# Altium PCB PCB1.pcbdoc (part 1 of 2)
Units mil, origin at the board's own origin, x right, y up, seen from the top; angles counter-clockwise.
Board outline 2165.35 x 3346.46 mil, 4 copper layers (Top Layer, Inner1, Inner2, Bottom Layer), stack 62.447 mil thick; 78 components, 74 nets, 396 pads, 501 vias.
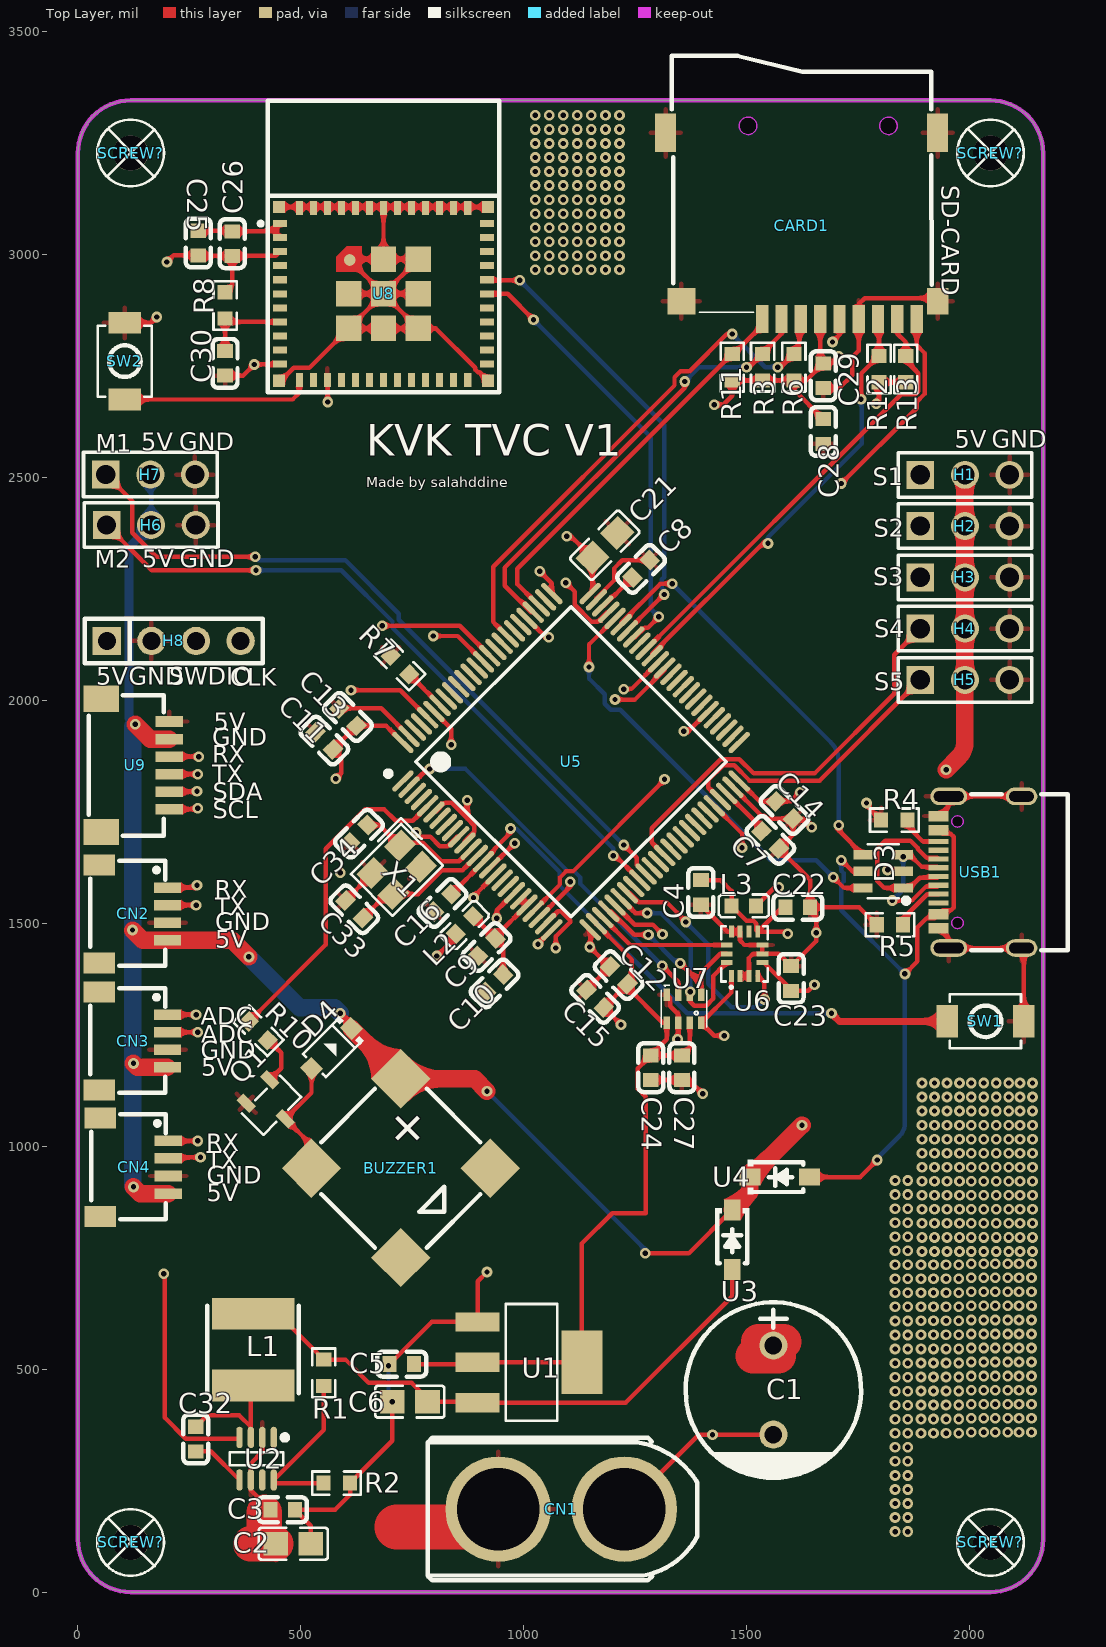
[diagram p0: Top Layer view]
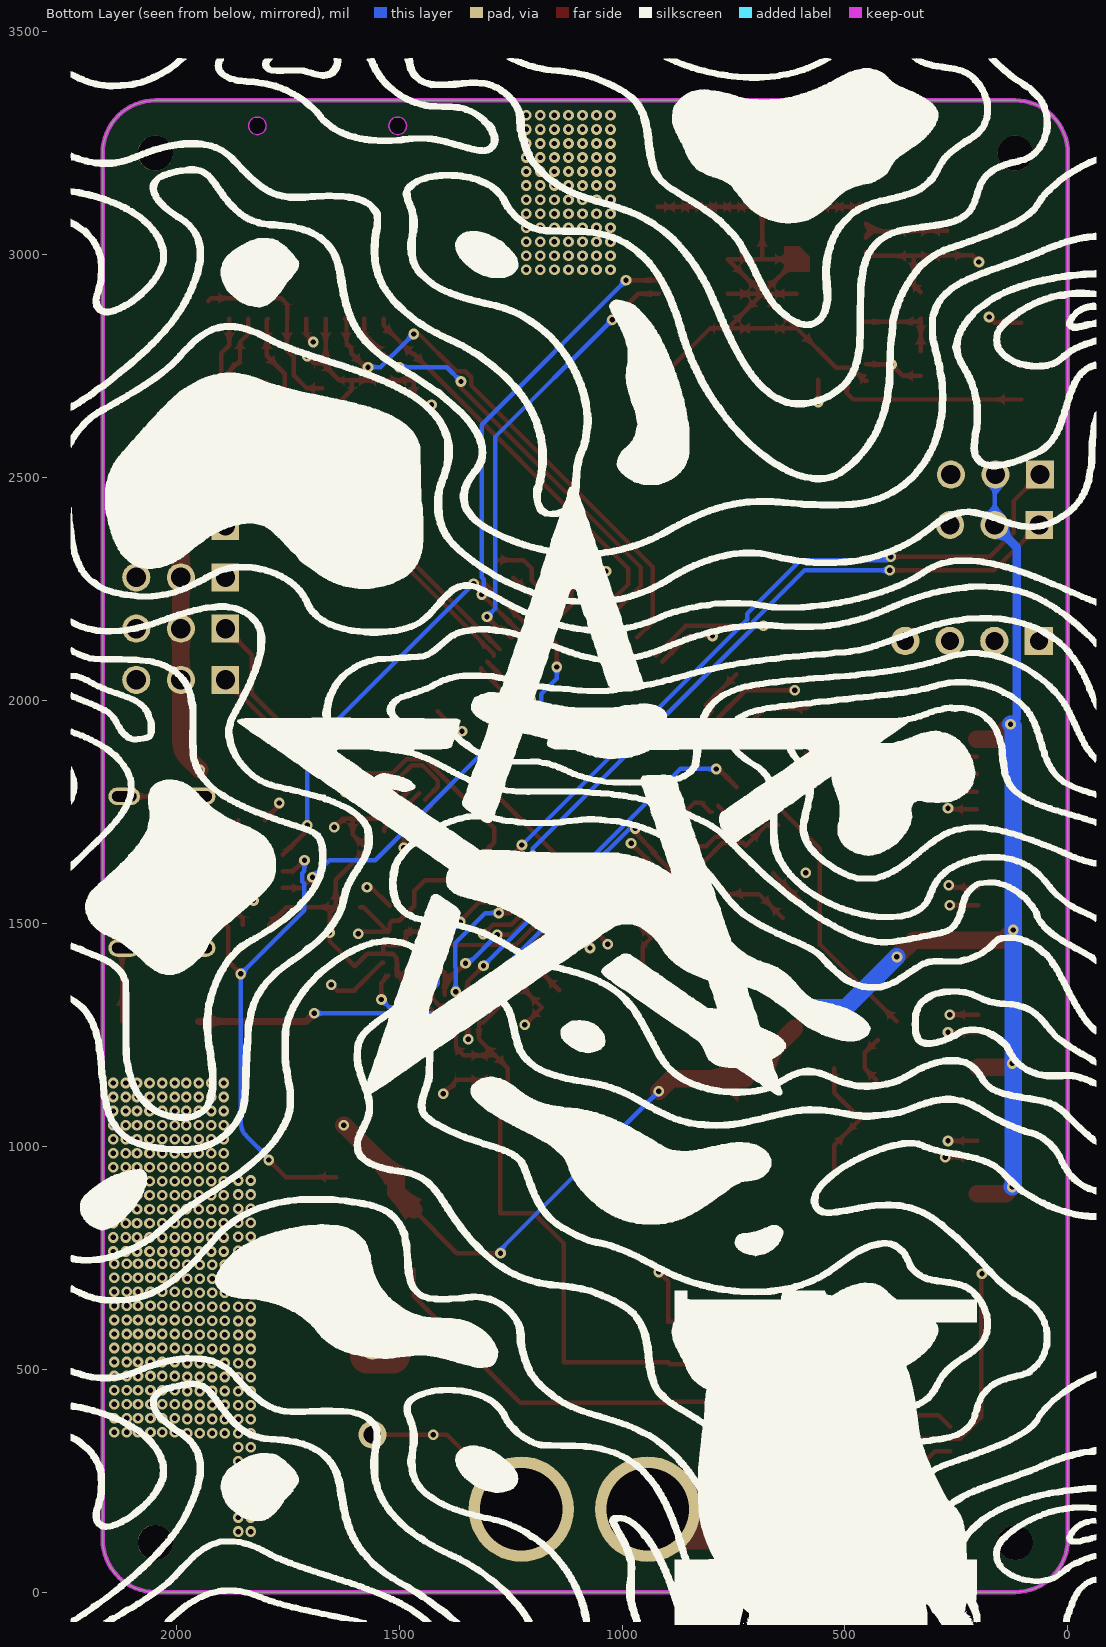
[diagram p1: Bottom Layer view, seen from below]
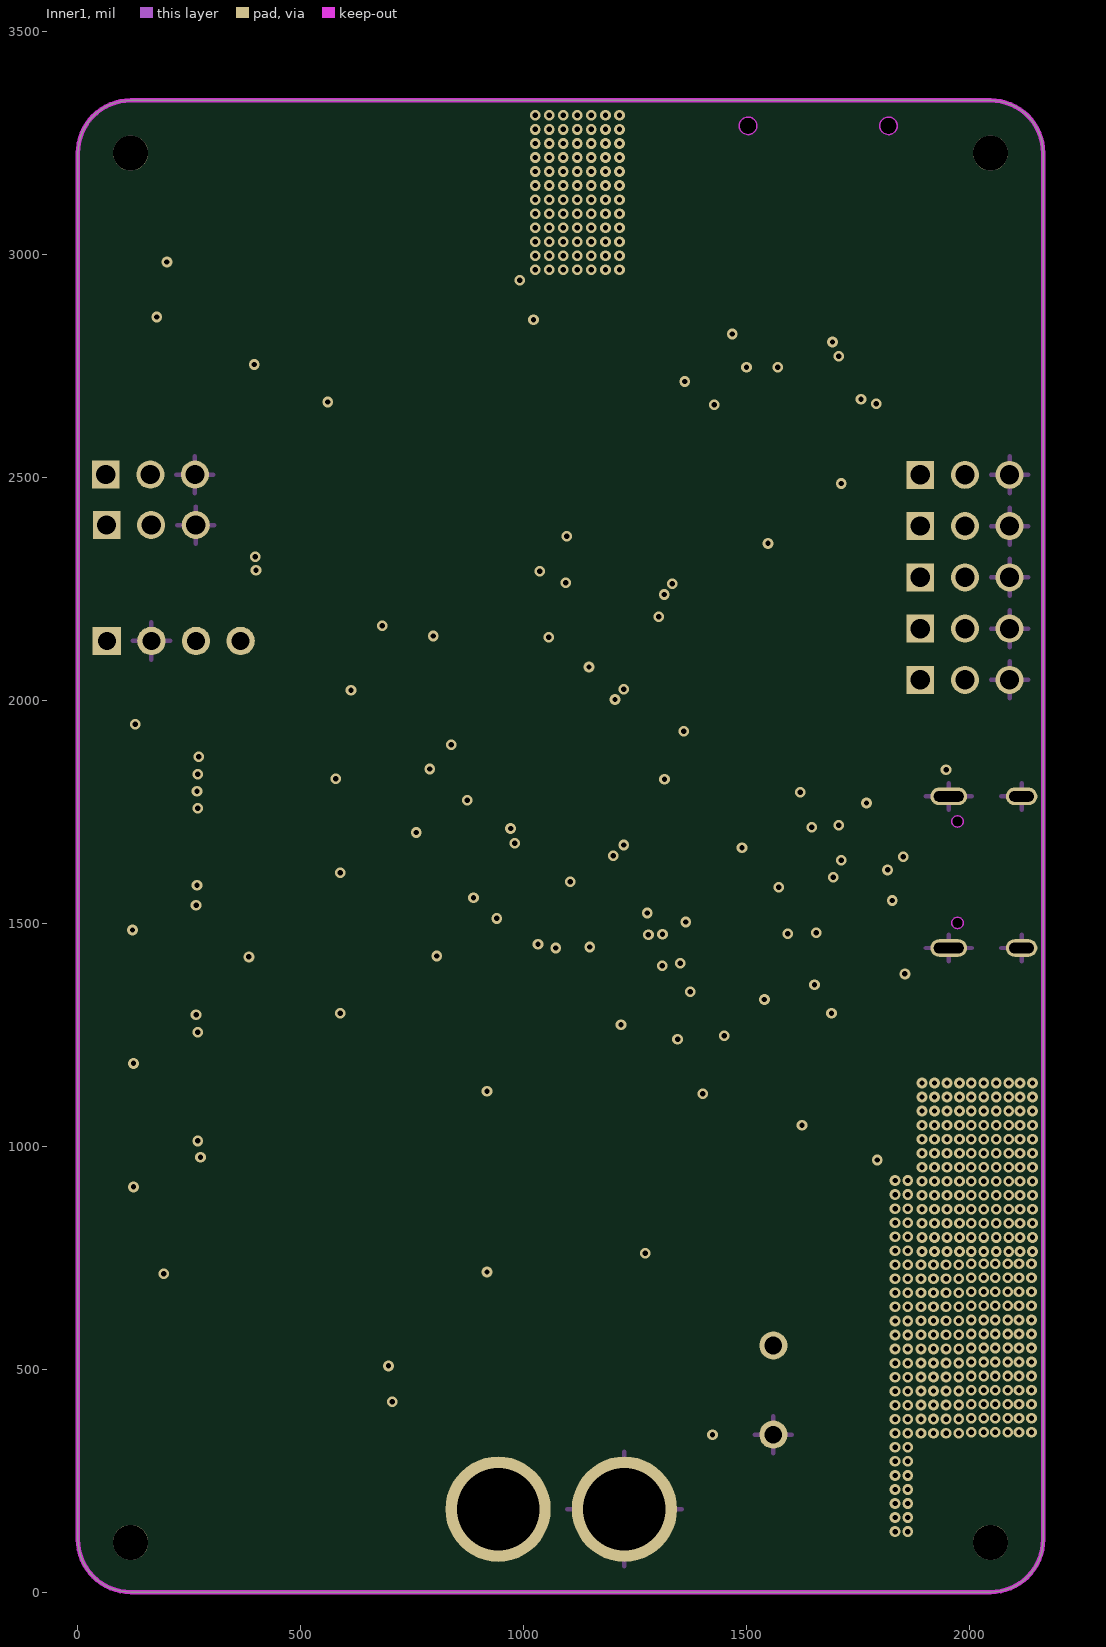
[diagram p2: Inner1]
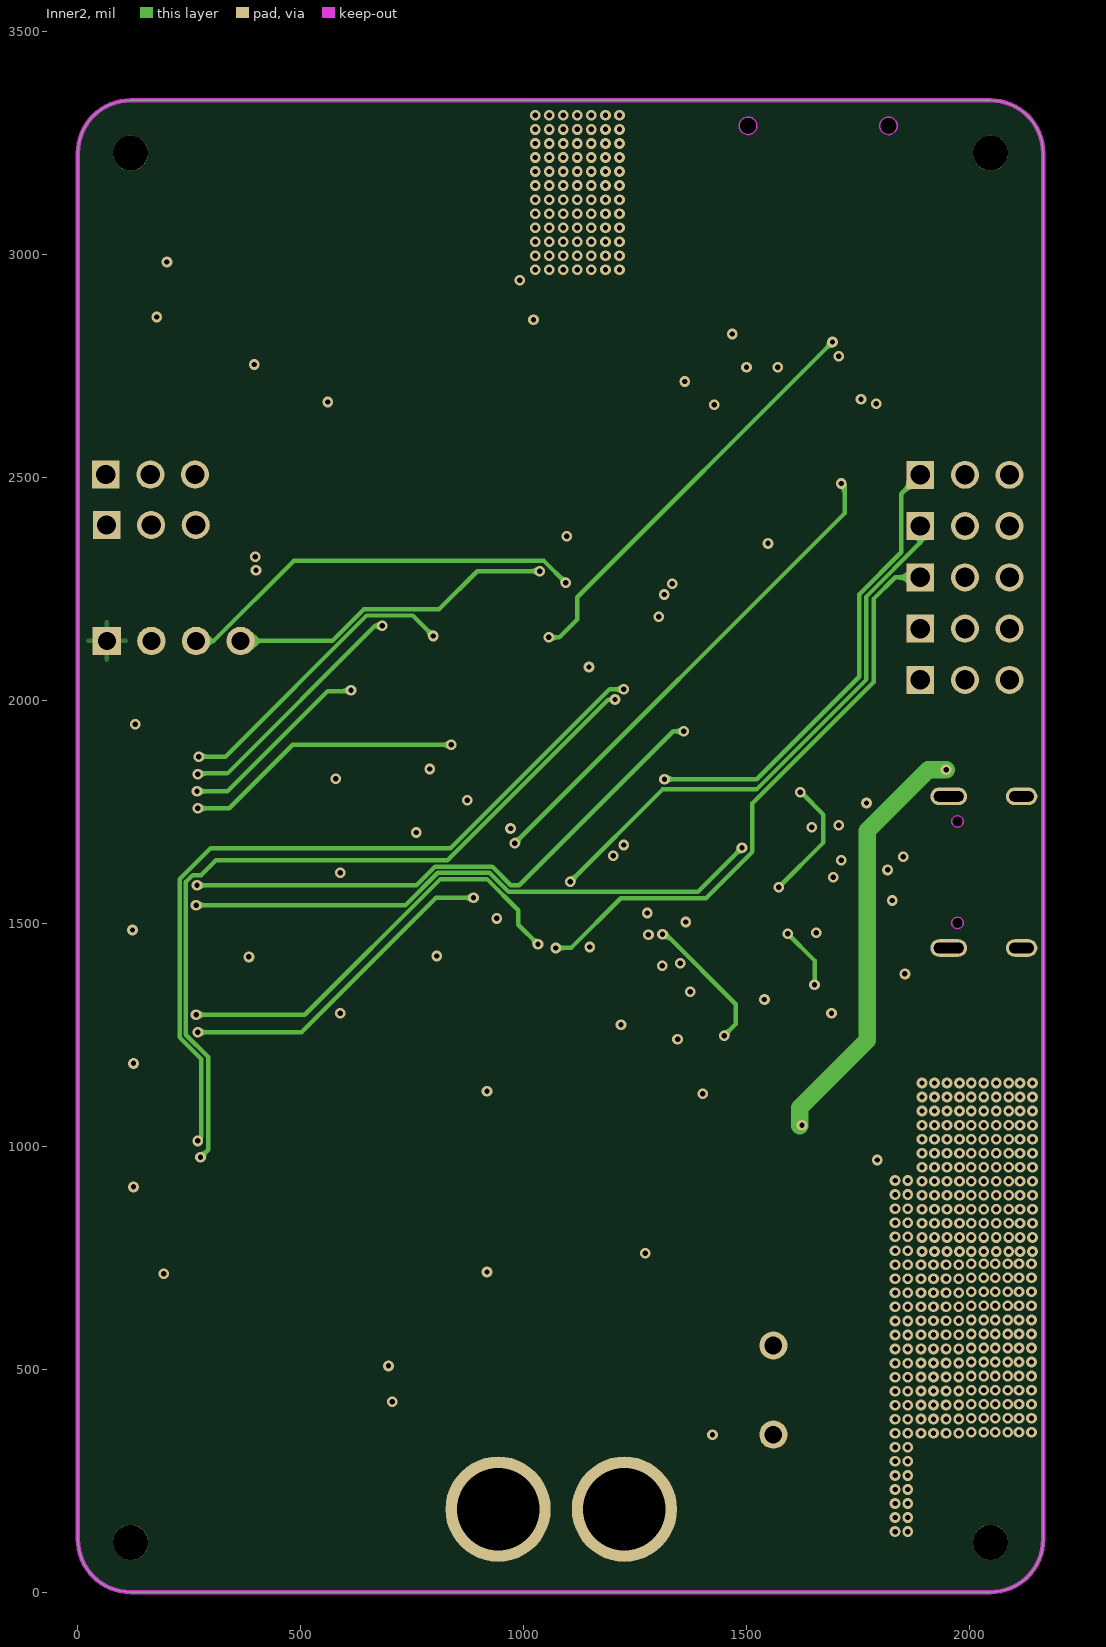
[diagram p3: Inner2]

## Layer stack, top to bottom
Top Layer: signal copper 1.378
Dielectric1: surface 8.283, 7628 RC49% 8.6mil, Dk 0
Inner1: signal copper 0.598
Dielectric2: surface 41.929, 1.1mm H/HOZ Copper, Dk 0
Inner2: signal copper 0.598
Dielectric3: surface 8.283, 7628 RC49% 8.6mil, Dk 0
Bottom Layer: signal copper 1.378

## Board outline
118.11,3346.46 ccw(c118.11,3228.35) 0,3228.35 0,118.11 ccw(c118.11,118.11) 118.11,0 2047.24,0 ccw(c2047.24,118.11) 2165.35,118.11 2165.35,3228.35 ccw(c2047.24,3228.35) 2047.24,3346.46 118.11,3346.46

## Design rules (kind name [scope] priority, off if disabled: settings)
BoardOutlineClearance copperThickness2oz_1 [All] p2 off: genericclearance=7.99 ignorepadtopadclearanceinfootprint=FALSE except(0: Arc-SplitContinuation Track-SplitContinuation SMDPad-SplitContinuation THPad-SplitContinuation Via-SplitContinuation Fill-SplitContinuation Region-SplitContinuation Poly-SplitContinuation Text-SplitContinuation Hole-SplitContinuation; 5.98: Arc-CutoutEdge SMDPad-CutoutEdge THPad-CutoutEdge Via-CutoutEdge Fill-CutoutEdge Region-CutoutEdge Text-CutoutEdge; 6.93: Hole-OutlineEdge Hole-CutoutEdge; 10: Poly-OutlineEdge Poly-CutoutEdge; 11.81: Arc-OutlineEdge Track-OutlineEdge SMDPad-OutlineEdge THPad-OutlineEdge Via-OutlineEdge Fill-OutlineEdge Region-OutlineEdge Text-OutlineEdge Track-CutoutEdge)
BoardOutlineClearance copperThickness1oz_1 [All] p4: genericclearance=4.02 ignorepadtopadclearanceinfootprint=FALSE except(0: Arc-SplitContinuation Track-SplitContinuation SMDPad-SplitContinuation THPad-SplitContinuation Via-SplitContinuation Fill-SplitContinuation Region-SplitContinuation Poly-SplitContinuation Text-SplitContinuation Hole-SplitContinuation; 6: SMDPad-CutoutEdge THPad-CutoutEdge Via-CutoutEdge Fill-CutoutEdge Region-CutoutEdge Text-CutoutEdge; 6.93: Hole-OutlineEdge Hole-CutoutEdge; 10: Poly-OutlineEdge Poly-CutoutEdge; 11.8: Arc-OutlineEdge Track-OutlineEdge SMDPad-OutlineEdge THPad-OutlineEdge Via-OutlineEdge Fill-OutlineEdge Region-OutlineEdge Text-OutlineEdge; 11.81: Arc-CutoutEdge Track-CutoutEdge)
Clearance copperThickness2oz [All] p1 off: gap=7.99 ignorepadtopadclearanceinfootprint=FALSE except(5.98: SMDPad-Track SMDPad-SMDPad THPad-Track SMDPad-THPad THPad-THPad Track-Via SMDPad-Via THPad-Via Via-Via Fill-Track Region-Track Fill-SMDPad Region-SMDPad Fill-THPad Region-THPad Fill-Via Region-Via Fill-Fill Fill-Region Region-Region Arc-Track Arc-SMDPad Arc-THPad Arc-Via Fill-Arc Region-Arc Arc-Arc Text-Track SMDPad-Text Text-THPad Text-Via Fill-Text Region-Text Arc-Text Text-Text; 6.93: Hole-Track Hole-SMDPad Hole-THPad Hole-Via Fill-Hole Region-Hole Hole-Arc Hole-Text; 10: Poly-Track Poly-SMDPad Poly-THPad Poly-Via Poly-Fill Poly-Region Poly-Poly Poly-Arc Poly-Text Poly-Hole)
Clearance copperThickness1oz [All] p3: gap=4.02 ignorepadtopadclearanceinfootprint=FALSE except(5.98: SMDPad-Track SMDPad-SMDPad THPad-Track SMDPad-THPad THPad-THPad Track-Via SMDPad-Via THPad-Via Via-Via Fill-Track Region-Track Fill-SMDPad Region-SMDPad Fill-THPad Region-THPad Fill-Via Region-Via Fill-Fill Fill-Region Region-Region; 6: Arc-Track Arc-SMDPad Arc-THPad Arc-Via Fill-Arc Region-Arc Arc-Arc Text-Track SMDPad-Text Text-THPad Text-Via Fill-Text Region-Text Arc-Text Text-Text; 6.93: Hole-Track Hole-SMDPad Hole-THPad Hole-Via Fill-Hole Region-Hole Hole-Arc Hole-Text; 10: Poly-Track Poly-SMDPad Poly-THPad Poly-Via Poly-Fill Poly-Region Poly-Poly Poly-Arc Poly-Text Poly-Hole)
Creepage creepage [All] p1: checkdistance=0 ignoreinternallayers=TRUE applytopolygonpour=TRUE
DiffPairsRouting differentialPair [All] p1: maxlimit=6 minlimit=6 mostfreqgap=6 toplayer_minwidth=5 toplayer_prefwidth=10 toplayer_maxwidth=100 toplayer_mingap=6 toplayer_prefgap=6 toplayer_maxgap=6 midlayer1_minwidth=5 midlayer1_prefwidth=10 midlayer1_maxwidth=100 midlayer1_mingap=6 midlayer1_prefgap=6 midlayer1_maxgap=6 midlayer2_minwidth=5 midlayer2_prefwidth=10 midlayer2_maxwidth=100 midlayer2_mingap=6 midlayer2_prefgap=6 midlayer2_maxgap=6 bottomlayer_minwidth=5 bottomlayer_prefwidth=10 bottomlayer_maxwidth=100 bottomlayer_mingap=6 bottomlayer_prefgap=6 bottomlayer_maxgap=6 maxuncoupledlength=10
HoleToHoleClearance otherClearance [All] p1: gap=11.81 allowstackedmicrovias=TRUE
Length netLength [All] p1: minlimit=0 maxlimit=0
MatchedLengths netLengthTolerance [All] p1: tolerance=1000
PasteMaskExpansion pasteMaskExpansion [All] p1: expansion=0
PlaneConnect innerPlane [All] p1: planeconnectstyle=Relief reliefexpansion=20 reliefentries=4 reliefconductorwidth=10 reliefairgap=10
PolygonConnect copperRegion [(InNet('GND') OR InNet('3.3V') OR InNet('B+'))] p1: connectstyle=Relief reliefconductorwidth=10 reliefentries=4 polygonreliefangle="90 Angle" airgapwidth=10 via.connectstyle=Relief via.reliefconductorwidth=10 via.reliefentries=4 via.polygonreliefangle="90 Angle" via.airgapwidth=10
RoutingVias viaSize [All] p1: holewidth=12.01 width=24.02 viastyle="Through Hole" minholewidth=11.81 minwidth=19.68 maxholewidth=248.03 maxwidth=393.7
SolderMaskExpansion solderMaskExpansion [IsVia] p1: expansion=-1000 istentingtop=TRUE
SolderMaskExpansion solderMaskExpansion [All] p2: expansion=2 istentingtop=FALSE
Width copperThickness2oz_2 [All] p1 off: maxlimit=100 minlimit=8 preferedwidth=10
Width copperThickness1oz_2 [All] p2: maxlimit=100 minlimit=5 preferedwidth=10

## Components (designator, comment, footprint, x,y, rotation, side; value= is the part's Value field where it differs from the comment)
BUZZER1 "2.7kHz" BUZ-SMD_4P-L8.5-W8.5-P8.50-BR 724.34,950.8 r225 top
C1 "470uF" CAP-TH_BD10.0-P5.00-D1.0-FD 1560.12,453.11 r270 top
C2 "10uF" C0805 483.13,108.38 r180 top
C3 "100nF" C0603 459.04,184.68 r180 top
C4 "10uF" C0603 1397.48,1569.49 r90 top
C5 "10uF" C0603 726.49,511.34 r180 top
C6 "10uF" C0805 744.56,427.01 r0 top
C7 "2.2uF" C0603 1553.27,1687.33 r135 top
C8 "2.2uF" C0603 1263.36,2295.45 r225 top
C9 "10nF" C0603 916.87,1446.92 r45 top
C10 "1uF" C0603 934.55,1365.6 r225 top
C11 "100nF" C0603 552.71,1910.07 r135 top
C12 "100nF" C0603 1213.25,1383.88 r315 top
C13 "100nF" C0603 605.75,1963.11 r315 top
C14 "100nF" C0603 1585.09,1754.51 r315 top
C15 "100nF" C0603 1160.22,1330.85 r315 top
C16 "100nF" C0603 817.88,1545.91 r45 top
C21 "4.7uF" C0805 1182.04,2348.48 r225 top
C22 "100nF" C0603 1615,1536.46 r180 top
C23 "100nF" C0603 1600,1376.46 r270 top
C24 "100nF" C0603 1285,1176.46 r90 top
C25 "10uF" C0603 270,3026.46 r270 top
C26 "100nF" C0603 346.06,3025.03 r90 top
C27 "100nF" C0603 1355,1176.46 r90 top
C28 "10uF" C0603 1672.24,2603.65 r90 top
C29 "100nF" C0603 1672.24,2728.65 r90 top
C30 "1uF" C0603 330,2756.46 r270 top
C32 "100nF" C0603 264.27,343.3 r90 top
C33 "15pF" C0603 619.89,1531.77 r315 top
C34 "15pF" C0603 630.5,1701.39 r225 top
CARD1 "TF-02A" TF-SMD_TF-02 1623.62,3065.04 r180 top
CN1 "XT60U-M" CONN-TH_XT60U-M 1084.25,186.06 r180 top
CN2 "SM04B-SRSS-TB(LF)(SN)" CONN-SMD_4P-P1.00_SM04B-SRSS-TB-LF-SN 124.49,1521.3 r270 top
CN3 "SM04B-SRSS-TB(LF)(SN)" CONN-SMD_4P-P1.00_SM04B-SRSS-TB-LF-SN 124.49,1236.18 r270 top
CN4 "SM04B-SRSS-TB(LF)(SN)" CONN-SMD_4P-P1.00_SM04B-SRSS-TB-LF-SN 126.5,953.07 r270 top
D3 "USBLC6-2SC6" SOT-23-6_L2.9-W1.6-P0.95-LS2.8-BL 1806.57,1616.99 r90 top
D4 "1N4148W" SOD-123_L2.7-W1.6-LS3.7-FD 568.78,1219.5 r45 top
H1 "servo 1" HDR-TH_3P-P2.54-V-M-1 1990,2506.46 r0 top
H2 "servo 2" HDR-TH_3P-P2.54-V-M-1 1990,2391.46 r0 top
H3 "servo 3" HDR-TH_3P-P2.54-V-M-1 1990,2276.46 r0 top
H4 "servo 4" HDR-TH_3P-P2.54-V-M-1 1990,2161.46 r0 top
H5 "servo 5" HDR-TH_3P-P2.54-V-M-1 1990,2046.46 r0 top
H6 "esc 1" HDR-TH_3P-P2.54-V-M-1 164.25,2393.78 r0 top
H7 "esc 2" HDR-TH_3P-P2.54-V-M-1 162.44,2507.02 r0 top
H8 "swd" HDR-TH_4P-HX-PH254-01-04-Z-L11.5 214.84,2133.7 r0 top
L1 "5.6uH" IND-SMD_L5.0-W5.0_SMNR5030 392.78,544.09 r270 top
L2 "BLM18PG121SN1D" L0603 867.38,1496.42 r45 top
L3 "BLM18PG121SN1D" L0603 1493.86,1539.37 r180 top
Q1 "MMBT3904" SOT-23-3_L3.0-W1.7-P0.95-LS2.9-BR 434.43,1092.22 r135 top
R1 "51.1kΩ" R0603 551.4,491.89 r90 top
R2 "10kΩ" R0603 580.28,244.29 r0 top
R3 "10kΩ" R0603 1536.02,2748.11 r90 top
R4 "5.1kΩ" R0603 1831.57,1731.99 r0 top
R5 "5.1kΩ" R0603 1821.57,1496.99 r0 top
R6 "10kΩ" R0603 1606.3,2748.11 r90 top
R7 "10kΩ" R0603 722.42,2079.78 r135 top
R8 "10kΩ" R0603 330,2886.46 r270 top
R10 "1kΩ" R0603 404.58,1259.04 r315 top
R11 "10kΩ" R0603 1467.76,2748.11 r90 top
R12 "10kΩ" R0603 1797.24,2743.65 r90 top
R13 "10kΩ" R0603 1857.24,2743.65 r90 top
SCREW? "" Screw-Hole-M2 118.11,111.46 r0 top
SCREW? "" Screw-Hole-M2 2047.24,111.46 r0 top
SCREW? "" Screw-Hole-M2 118.11,3228.35 r0 top
SCREW? "" Screw-Hole-M2 2047.24,3228.35 r0 top
SW1 "reset" SW-SMD_L3.9-W3.0-P4.45 2035.98,1280.35 r0 top
SW2 "push but" SW-SMD_L3.9-W3.0-P4.45 105,2761.46 r270 top
U1 "AMS1117-3.3" SOT-223-3_L6.5-W3.5-P3.05-LS7.0 1013.61,515.35 r180 top
U2 "MP2315GJ-Z-JSM" TSOT-23-8_L2.9-W1.6-P0.65-LS2.8-BR 400.81,299.13 r90 top
U3 "MBR0520L" SOD-123_L2.7-W1.6-LS3.7-RD-1 1467.76,790.43 r270 top
U4 "MBR0520L" SOD-123_L2.7-W1.6-LS3.7-RD-1 1574.17,930.98 r0 top
U5 "STM32H743VIT6" LQFP-100_L14.0-W14.0-P0.50-LS16.0-BL 1106.15,1862.79 r315 top
U6 "ICM-42688-P" LGA-14_L3.0-W2.5-P0.50-TL 1495.57,1431.9 r90 top
U7 "DPS310" LGA-8_DPS310XTSA1 1359.71,1308.83 r90 top
U8 "2.4GHz" WIFIM-SMD_ESP32-C3-MINI-1 685.53,2912.59 r0 top
U9 "GPS" CONN-SMD_SM06B-SRSS-TB-LF-SN 128.5,1854.61 r270 top
USB1 "TYPE-C16PIN" USB-C-SMD_TYPE-C16PIN 2023.96,1615.01 r90 top
X1 "8MHz" CRYSTAL-SMD_4P-L3.2-W2.5-BL 715.35,1620.16 r225 top

## Footprints (in the part's own frame and the unit in brackets; to place one, negate y for a bottom-side part, rotate by r counter-clockwise, add the part's x,y. Pads: shape width x height; smd on the part's side, far side on the other; paste and mask are expansions set on the pad)
BUZ-SMD_4P-L8.5-W8.5-P8.50-BR [mil]
  rect 94.49x94.49 smd: 1(-141.73,-141.73) 2(141.73,-141.73) 3(141.72,141.72) 4(-141.73,141.73)
  silkscreen extent -167,-167 167,167
C0603 [mm]
  rect 0.8x0.9 smd: 1(-0.7,0) 2(0.7,0)
  silkscreen extent -1.39,-0.71 1.39,0.71
C0805 [mm]
  rect 1.41x1.35 smd paste-100 mask+0.051: 1(-1,0) 2(1,0)
  silkscreen extent -1.96,-0.9 1.96,0.9
CAP-TH_BD10.0-P5.00-D1.0-FD [mm]
  round 1.6 hole 1: 1(-2.54,0) 2(2.54,0)
  silkscreen extent -5,-5 5.08,5
CONN-SMD_4P-P1.00_SM04B-SRSS-TB-LF-SN [mm]
  rect 0.6x1.55 smd: 1(-1.5,1.938) 2(-0.5,1.938) 3(0.5,1.938) 4(1.5,1.938)
  rect 1.2x1.8 smd: 5(2.8,-1.938) 6(-2.8,-1.938)
  silkscreen extent -3.02,-2.46 2.96,1.8
CONN-SMD_SM06B-SRSS-TB-LF-SN [mm]
  rect 0.6x1.55 smd: 1(-2.5,1.938) 2(-1.5,1.938) 3(-0.5,1.938) 4(0.5,1.938) 5(1.5,1.938) 6(2.5,1.938)
  rect 1.5x2 smd: 7(3.8,-1.938) 8(-3.8,-1.938)
  silkscreen extent -4,-2.64 4,1.61
CONN-TH_XT60U-M [mm]
  round 6 hole 4.7 paste+0 mask+0.05: 1(3.6,0) 2(-3.6,0)
  silkscreen extent -7.75,-4.06 7.62,4.06
CRYSTAL-SMD_4P-L3.2-W2.5-BL [mm]
  rect 1.4x1.2 smd: 1(-1.1,-0.85) 2(1.1,-0.85) 3(1.1,0.85) 4(-1.1,0.85)
  silkscreen extent -2.26,-1.91 2.03,1.68
HDR-TH_3P-P2.54-V-M-1 [mm]
  rect 1.575x1.6 hole 1.1: 1(-2.54,0)
  round 1.6 hole 1.1: 2(0,0) 3(2.54,0)
  silkscreen extent -3.81,-1.27 3.81,1.27
HDR-TH_4P-HX-PH254-01-04-Z-L11.5 [mm]
  rect 1.62x1.62 hole 1.02: 1(-3.81,0)
  round 1.62 hole 1.02: 2(-1.27,0) 3(1.27,0) 4(3.81,0)
  silkscreen extent -5.08,-1.27 5.08,1.27
IND-SMD_L5.0-W5.0_SMNR5030 [mm]
  rect 1.8x4.7 smd: 1(-2.05,0) 2(2.05,0)
  silkscreen extent -2.5,-2.6 2.5,2.6
L0603 [mm]
  rect 0.8x0.864 smd paste-100 mask+0.051: 1(-0.7,0) 2(0.7,0)
  silkscreen extent -1.42,-0.65 1.42,0.65
LGA-8_DPS310XTSA1 [mil]
  rect 27.56x13.8 smd: 1(31.5,38.6) 2(31.5,13) 3(31.5,-13) 4(31.5,-38.6) 5(-31.5,-38.6) 6(-31.5,-13) 7(-31.5,13) 8(-31.5,38.6)
  silkscreen extent -41,-51 53,51
LGA-14_L3.0-W2.5-P0.50-TL [mm]
  rect 0.675x0.28 smd: 1(-1.262,0.75) 2(-1.262,0.25) 3(-1.262,-0.25) 4(-1.262,-0.75) 8(1.262,-0.75) 9(1.262,-0.25) 10(1.262,0.25) 11(1.262,0.75)
  rect 0.28x0.675 smd: 5(-0.5,-1.012) 6(0,-1.012) 7(0.5,-1.012) 12(0.5,1.012) 13(0,1.012) 14(-0.5,1.012)
  silkscreen extent -1.98,-1.33 1.58,1.33
LQFP-100_L14.0-W14.0-P0.50-LS16.0-BL [mm]
  oval 0.3x1.6 smd: 1(-6,-7.55) 2(-5.5,-7.55) 3(-5,-7.55) 4(-4.5,-7.55) 5(-4,-7.55) 6(-3.5,-7.55) 7(-3,-7.55) 8(-2.5,-7.55) 9(-2,-7.55) 10(-1.5,-7.55) 11(-1,-7.55) 12(-0.5,-7.55) 13(0,-7.55) 14(0.5,-7.55) 15(1,-7.55) 16(1.5,-7.55) 17(2,-7.55) 18(2.5,-7.55) 19(3,-7.55) 20(3.5,-7.55) 21(4,-7.55) 22(4.5,-7.55) 23(5,-7.55) 24(5.5,-7.55) 25(6,-7.55) 51(6,7.55) 52(5.5,7.55) 53(5,7.55) 54(4.5,7.55) 55(4,7.55) 56(3.5,7.55) 57(3,7.55) 58(2.5,7.55) 59(2,7.55) 60(1.5,7.55) 61(1,7.55) 62(0.5,7.55) 63(0,7.55) 64(-0.5,7.55) 65(-1,7.55) 66(-1.5,7.55) 67(-2,7.55) 68(-2.5,7.55) 69(-3,7.55) 70(-3.5,7.55) 71(-4,7.55) 72(-4.5,7.55) 73(-5,7.55) 74(-5.5,7.55) 75(-6,7.55)
  oval 1.6x0.3 smd: 26(7.55,-6) 27(7.55,-5.5) 28(7.55,-5) 29(7.55,-4.5) 30(7.55,-4) 31(7.55,-3.5) 32(7.55,-3) 33(7.55,-2.5) 34(7.55,-2) 35(7.55,-1.5) 36(7.55,-1) 37(7.55,-0.5) 38(7.55,0) 39(7.55,0.5) 40(7.55,1) 41(7.55,1.5) 42(7.55,2) 43(7.55,2.5) 44(7.55,3) 45(7.55,3.5) 46(7.55,4) 47(7.55,4.5) 48(7.55,5) 49(7.55,5.5) 50(7.55,6) 76(-7.55,6) 77(-7.55,5.5) 78(-7.55,5) 79(-7.55,4.5) 80(-7.55,4) 81(-7.55,3.5) 82(-7.55,3) 83(-7.55,2.5) 84(-7.55,2) 85(-7.55,1.5) 86(-7.55,1) 87(-7.55,0.5) 88(-7.55,0) 89(-7.55,-0.5) 90(-7.55,-1) 91(-7.55,-1.5) 92(-7.55,-2) 93(-7.55,-2.5) 94(-7.55,-3) 95(-7.55,-3.5) 96(-7.55,-4) 97(-7.55,-4.5) 98(-7.55,-5) 99(-7.55,-5.5) 100(-7.55,-6)
  silkscreen extent -7.03,-8 6.25,6.25
R0603 [mil]
  rect 31.75x34.02 smd paste-3937.01 mask+2: 1(-29.66,0) 2(29.66,0)
  silkscreen extent -55,-26 55,26
Screw-Hole-M2 [mm]
  round 2 hole 2: 1(0,0)
  silkscreen extent -1.9,-1.9 1.9,1.9
SOD-123_L2.7-W1.6-LS3.7-FD [mm]
  rect 0.88x0.96 smd: 1(-1.61,0) 2(1.61,0)
  silkscreen extent -1.38,-1 1.6,1
SOD-123_L2.7-W1.6-LS3.7-RD-1 [mm]
  rect 1.2x0.95 smd: 1(-1.7,0) 2(1.7,0)
  silkscreen extent -1.81,-0.98 1.35,0.98
SOT-23-3_L3.0-W1.7-P0.95-LS2.9-BR [mil]
  rect 40.85x20.95 smd: 1(43.36,-37.4) 2(43.36,37.4) 3(-43.36,0)
  silkscreen extent -34,-60 34,60
SOT-23-6_L2.9-W1.6-P0.95-LS2.8-BL [mil]
  rect 20.95x42.2 smd: 1(-37.4,-45.24) 2(0,-45.24) 3(37.4,-45.24) 4(37.4,45.24) 5(0,45.24) 6(-37.4,45.24)
  silkscreen extent -72,-57 61,35
SOT-223-3_L6.5-W3.5-P3.05-LS7.0 [mm]
  rect 2.5x1.1 smd: 1(2.97,-2.3) 2(2.97,0) 3(2.97,2.3)
  rect 2.34x3.6 smd: 4(-2.97,0)
  silkscreen extent -1.57,-3.33 1.37,3.33
SW-SMD_L3.9-W3.0-P4.45 [mm]
  rect 1.23x1.86 smd: 1(-2.185,0) 2(2.185,0)
  silkscreen extent -2.03,-1.54 2.03,1.54
TF-SMD_TF-02 [mm]
  rect 0.7x1.6 smd: 1(2.245,5.3) 2(1.145,5.3) 3(0.046,5.3) 4(-1.054,5.3) 5(-2.154,5.3) 6(-3.255,5.3) 7(-4.354,5.3) 8(-5.454,5.3) 9(-6.554,5.3)
  rect 1.2x1.5 smd: 10(-7.754,4.3)
  rect 1.2x2.2 smd: 11(-7.746,-5.3) 12(7.754,-5.3)
  rect 1.6x1.5 smd: 13(6.854,4.3)
  Board Outline Layer circle w0.003: c3.054,-5.7 r0.5
  Board Outline Layer circle w0.003: c-4.946,-5.7 r0.5
  Board Outline Layer region: 2.554,-5.7 2.603,-5.483 2.742,-5.309 2.943,-5.213 3.165,-5.213 3.366,-5.309 3.504,-5.483 3.554,-5.7 3.554,-5.7 3.504,-5.917 3.366,-6.091 3.165,-6.187 2.943,-6.187 2.742,-6.091 2.603,-5.917 2.554,-5.7
  Board Outline Layer region: 2.554,-5.7 2.564,-5.602 2.592,-5.509 2.638,-5.422 2.7,-5.346 2.776,-5.284 2.863,-5.238 2.956,-5.21 3.054,-5.2 3.152,-5.21 3.245,-5.238 3.332,-5.284 3.408,-5.346 3.47,-5.422 3.516,-5.509 3.544,-5.602 3.554,-5.7 3.544,-5.798 3.516,-5.891 3.47,-5.978 3.408,-6.054 3.332,-6.116 3.245,-6.162 3.152,-6.19 3.054,-6.2 2.956,-6.19 2.863,-6.162 2.776,-6.116 2.7,-6.054 2.638,-5.978 2.592,-5.891 2.564,-5.798
  Board Outline Layer region: -5.446,-5.7 -5.396,-5.483 -5.258,-5.309 -5.057,-5.213 -4.835,-5.213 -4.634,-5.309 -4.496,-5.483 -4.446,-5.7 -4.446,-5.7 -4.496,-5.917 -4.634,-6.091 -4.835,-6.187 -5.057,-6.187 -5.258,-6.091 -5.396,-5.917 -5.446,-5.7
  Board Outline Layer region: -5.446,-5.7 -5.436,-5.602 -5.408,-5.509 -5.362,-5.422 -5.3,-5.346 -5.224,-5.284 -5.137,-5.238 -5.044,-5.21 -4.946,-5.2 -4.848,-5.21 -4.755,-5.238 -4.668,-5.284 -4.592,-5.346 -4.53,-5.422 -4.484,-5.509 -4.456,-5.602 -4.446,-5.7 -4.456,-5.798 -4.484,-5.891 -4.53,-5.978 -4.592,-6.054 -4.668,-6.116 -4.755,-6.162 -4.848,-6.19 -4.946,-6.2 -5.044,-6.19 -5.137,-6.162 -5.224,-6.116 -5.3,-6.054 -5.362,-5.978 -5.408,-5.891 -5.436,-5.798
  Multi-Layer board cut-out: 2.554,-5.7 2.603,-5.483 2.742,-5.309 2.943,-5.213 3.165,-5.213 3.366,-5.309 3.504,-5.483 3.554,-5.7 3.554,-5.7 3.504,-5.917 3.366,-6.091 3.165,-6.187 2.943,-6.187 2.742,-6.091 2.603,-5.917 2.554,-5.7
  Multi-Layer board cut-out: -5.446,-5.7 -5.396,-5.483 -5.258,-5.309 -5.057,-5.213 -4.835,-5.213 -4.634,-5.309 -4.496,-5.483 -4.446,-5.7 -4.446,-5.7 -4.496,-5.917 -4.634,-6.091 -4.835,-6.187 -5.057,-6.187 -5.258,-6.091 -5.396,-5.917 -5.446,-5.7
  silkscreen extent -7.41,-9.68 7.39,4.93
TSOT-23-8_L2.9-W1.6-P0.65-LS2.8-BR [mil]
  oval 48.11x14.33 smd: 1(47.68,-38.39) 2(47.68,-12.8) 3(47.68,12.79) 4(47.68,38.39) 5(-47.68,38.39) 6(-47.68,12.79) 7(-47.68,-12.8) 8(-47.68,-38.39)
  silkscreen extent -15,-69 54,60
USB-C-SMD_TYPE-C16PIN [mm]
  oval 1x2.1 hole 0.6 slot 1.7 at 90 deg: 1(-4.32,1.787) 2(4.32,1.787)
  oval 1x1.8 hole 0.6 slot 1.4 at 90 deg: 3(-4.32,-2.362) 4(4.32,-2.362)
  rect 0.6x1.15 smd paste-100 mask+0.051: A1B12(-3.2,2.362) A4B9(-2.4,2.362) B1A12(3.2,2.362) B4A9(2.4,2.362)
  rect 0.3x1.15 smd paste-100 mask+0.051: A5(-1.25,2.362) A6(-0.25,2.362) A7(0.25,2.362) A8(1.25,2.362) B5(1.75,2.362) B6(0.75,2.362) B7(-0.75,2.362) B8(-1.75,2.362)
  Board Outline Layer circle w0.003: c2.89,1.288 r0.325
  Board Outline Layer circle w0.003: c-2.89,1.288 r0.325
  Board Outline Layer region: 2.89,0.963 2.749,0.995 2.636,1.085 2.573,1.216 2.573,1.36 2.636,1.491 2.749,1.581 2.89,1.613 2.89,1.613 3.031,1.581 3.144,1.491 3.207,1.36 3.207,1.216 3.144,1.085 3.031,0.995 2.89,0.963
  Board Outline Layer region: 2.89,0.963 2.812,0.972 2.739,1 2.675,1.045 2.623,1.103 2.586,1.173 2.567,1.249 2.567,1.327 2.586,1.403 2.623,1.473 2.675,1.531 2.739,1.576 2.812,1.604 2.89,1.613 2.968,1.604 3.041,1.576 3.106,1.531 3.157,1.473 3.194,1.403 3.213,1.327 3.213,1.249 3.194,1.173 3.157,1.103 3.106,1.045 3.041,1 2.968,0.972
  Board Outline Layer region: -2.89,0.963 -3.031,0.995 -3.144,1.085 -3.207,1.216 -3.207,1.36 -3.144,1.491 -3.031,1.581 -2.89,1.613 -2.89,1.613 -2.749,1.581 -2.636,1.491 -2.573,1.36 -2.573,1.216 -2.636,1.085 -2.749,0.995 -2.89,0.963
  Board Outline Layer region: -2.89,0.963 -2.968,0.972 -3.041,1 -3.106,1.045 -3.157,1.103 -3.194,1.173 -3.213,1.249 -3.213,1.327 -3.194,1.403 -3.157,1.473 -3.106,1.531 -3.041,1.576 -2.968,1.604 -2.89,1.613 -2.812,1.604 -2.739,1.576 -2.675,1.531 -2.623,1.473 -2.586,1.403 -2.567,1.327 -2.567,1.249 -2.586,1.173 -2.623,1.103 -2.675,1.045 -2.739,1 -2.812,0.972
  Multi-Layer board cut-out: 2.89,0.963 2.749,0.995 2.636,1.085 2.573,1.216 2.573,1.36 2.636,1.491 2.749,1.581 2.89,1.613 2.89,1.613 3.031,1.581 3.144,1.491 3.207,1.36 3.207,1.216 3.144,1.085 3.031,0.995 2.89,0.963
  Multi-Layer board cut-out: -2.89,0.963 -3.031,0.995 -3.144,1.085 -3.207,1.216 -3.207,1.36 -3.144,1.491 -3.031,1.581 -2.89,1.613 -2.89,1.613 -2.749,1.581 -2.636,1.491 -2.573,1.36 -2.573,1.216 -2.636,1.085 -2.749,0.995 -2.89,0.963
  silkscreen extent -4.45,-5 4.45,0.52
WIFIM-SMD_ESP32-C3-MINI-1 [mm]
  rect 0.8x0.4 smd paste+0 mask+0.05: 1(-5.9,4) 2(-5.9,3.2) 3(-5.9,2.4) 4(-5.9,1.6) 5(-5.9,0.8) 6(-5.9,0) 7(-5.9,-0.8) 8(-5.9,-1.6) 9(-5.9,-2.4) 10(-5.9,-3.2) 11(-5.9,-4) 25(5.9,-4) 26(5.9,-3.2) 27(5.9,-2.4) 28(5.9,-1.6) 29(5.9,-0.8) 30(5.9,0) 31(5.9,0.8) 32(5.9,1.6) 33(5.9,2.4) 34(5.9,3.2) 35(5.9,4)
  rect 0.4x0.8 smd paste+0 mask+0.05: 12(-4.8,-4.9) 13(-4,-4.9) 14(-3.2,-4.9) 15(-2.4,-4.9) 16(-1.6,-4.9) 17(-0.8,-4.9) 18(0,-4.9) 19(0.8,-4.9) 20(1.6,-4.9) 21(2.4,-4.9) 22(3.2,-4.9) 23(4,-4.9) 24(4.8,-4.9) 36(4.8,4.9) 37(4,4.9) 38(3.2,4.9) 39(2.4,4.9) 40(1.6,4.9) 41(0.8,4.9) 42(0,4.9) 43(-0.8,4.9) 44(-1.6,4.9) 45(-2.4,4.9) 46(-3.2,4.9) 47(-4,4.9) 48(-4.8,4.9)
  rect 1.45x1.45 smd paste+0 mask+0.05: 49(-1.975,-1.975) 49(-1.975,0) 49(0,-1.975) 49(0,0) 49(0,1.975) 49(1.975,-1.975) 49(1.975,0) 49(1.975,1.975)
  round 0.671 smd: 49(-1.926,1.926)
  rect 0.7x0.7 smd paste+0 mask+0.05: 50(5.95,4.95) 51(5.95,-4.95) 52(-5.95,-4.95) 53(-5.95,4.95)
  Top Layer region: -2.7,2.1 -2.1,2.7 -1.25,2.7 -1.25,1.25 -2.7,1.25
  silkscreen extent -7.1,-5.6 6.6,11

## Via types
v1: diameter 24.02, hole 12, Top Layer to Bottom Layer, 501 vias

## Nets (pads, with @x,y where several pads share a name; then routed paths per layer and width w, separated by ;. In a path a pad name is that pad's centre, name@x,y a point inside that pad or via, vN(x,y) a via of type N, cw(c..) or ccw(c..) an arc to the next point about the centre after c; other vN are vias at no path point)
3.3V: C5.1 C11.1 C12.2 C13.2 C14.1 C15.2 C21.2 C24.2 C25.2 C26.1 C27.2 C28.2 C29.2 CARD1.4 H8.1 L2.1 L3.1 R3.1 R6.1 R8.1 R11.1 R12.1 R13.1 U1.2 U1.4 U5.6 U5.11 U5.27 U5.50 U5.75 U5.100 U7.6 U7.8 U8.3 | length 4116.2
  Top Layer w10: v1(199.55,2983.93) 214.52,2998.9 C25.2@270,2998.9 271.43,2997.47 C26.1@346.06,2997.47 ; R8.1@330,2916.12 346.06,2932.18 C26.1@346.06,2997.47 ; U8.3@453.25,3007.08 443.63,2997.47 C26.1@346.06,2997.47 ; v1(578.27,1824.49) 590.32,1836.54 590.32,1872.47 C11.1@572.2,1890.59 C13.2@625.24,1943.62 691.25,1943.62 U5.100@728.93,1905.94 ; C5.1@754.05,511.34 892.67,511.34 U1.2@896.68,515.35 U1.4@1130.54,515.35 1130.54,781.96 1198.49,849.91 1273.74,849.91 1273.74,1111.16 1256.3,1128.6 1256.3,1175.32 C24.2@1285,1204.02 ; U5.6@798.53,1750.05 802.49,1750.05 823.55,1771.11 837.54,1771.11 873.43,1735.23 ; v1(805.16,1426.93) 847.89,1469.66 L2.1@847.89,1476.93 ; v1(873.43,1776.3) 873.43,1735.23 ; v1(1096.3,2368.62) 1106.22,2368.62 C21.2@1154.2,2320.64 1154.2,2244.91 U5.75@1149.29,2240 ; U5.27@1163.21,1499.49 1163.21,1498.56 1242.87,1418.9 1242.87,1374.53 C12.2@1232.74,1364.4 ; v1(1218.23,1272.83) C15.2@1179.71,1311.36 C12.2@1232.74,1364.4 ; U7.6@1372.71,1277.33 1372.71,1221.73 C27.2@1355,1204.02 C24.2@1285,1204.02 ; v1(1427.6,2663.78) 1447.68,2663.78 1467.76,2683.86 R11.1@1467.76,2718.45 R3.1@1536.02,2718.45 R6.1@1606.3,2718.45 ; U5.50@1483.36,1819.64 1529,1774 C14.1@1565.6,1774 1599.98,1774 v1(1620.35,1794.37) ; L3.1@1521.41,1539.37 1563.45,1581.41 v1(1572.47,1581.41) ; CARD1.4@1665.14,2856.38 1665.14,2763.31 C29.2@1672.24,2756.21 ; C28.2@1672.24,2631.21 1606.3,2697.15 R6.1@1606.3,2718.45 ; v1(1706.69,2772.2) 1690.69,2756.21 C29.2@1672.24,2756.21 ; v1(1791.02,2665.79) 1797.24,2672.01 R12.1@1797.24,2713.99 R13.1@1857.24,2713.99 ; U5.11@873.43,1689.71 873.43,1685.75 U5.11@868.13,1680.45 868.13,1684.41 U5.11@873.43,1689.71 ; U5.11@873.43,1689.71 889.19,1705.47 889.19,1719.46 873.43,1735.23 ; C12.2@1232.74,1364.4 1232.74,1356.75 1312.16,1277.33 U7.8@1321.11,1277.33 1321.11,1240.13 C24.2@1285,1204.02 ; R6.1@1606.3,2718.45 1634.49,2718.45 C29.2@1672.24,2756.21
  Inner2 w10: v1(1572.47,1581.41) 1672.56,1681.5 1672.56,1744.17 1622.36,1794.37 v1(1620.35,1794.37)
3.3V_IMU: C4.2 C22.2 C23.2 L3.2 U6.5 U6.8 | length 647.3
  Top Layer w10: C4.2@1397.48,1597.05 1442.2,1597.05 1466.3,1572.95 L3.2@1466.3,1539.37 1499.82,1505.86 1515.48,1505.86 1521.91,1499.42 1521.91,1484.78 U6.8@1525.1,1481.59 ; U6.5@1535.43,1412.22 1538.69,1412.22 1600,1350.91 C23.2@1600,1348.9 1638.7,1348.9 v1(1652.48,1362.68) ; C22.2@1587.44,1536.46 1579.97,1536.46 U6.8@1525.1,1481.59 ; v1(1592.24,1477.13) 1587.78,1481.59 U6.8@1525.1,1481.59
  Inner2 w10: v1(1592.24,1477.13) 1652.48,1416.89 v1(1652.48,1362.68)
5V: C6.2 L1.1 R1.2 U1.3 U3.2 | length 1320.6
  Top Layer w10: L1.1@392.78,624.8 448.15,624.8 R1.2@551.4,521.55 600.18,521.55 652.56,469.17 748.94,469.17 783.93,434.18 C6.2@783.93,427.01 894.48,427.01 U1.3@896.68,424.8 1228.62,424.8 1467.76,663.94 U3.2@1467.76,723.5
$1N104: C25.1 C26.2 U8.1 U8.2 | length 214.4
  Top Layer w10: C25.1@270,3054.02 344.63,3054.02 C26.2@346.06,3052.59 435.76,3052.59 ; U8.2@453.25,3038.57 439.23,3052.59 435.76,3052.59 ; U8.1@453.25,3070.07 435.76,3052.59
$1N105: U8.36 U8.37 U8.38 U8.39 U8.40 U8.41 U8.42 U8.43 U8.44 U8.45 U8.46 U8.47 U8.48 U8.49 U8.50 U8.51 U8.52 U8.53 | length 1902.2
  Top Layer w10: U8.52@451.28,2717.71 455.42,2717.71 484.12,2746.41 519.35,2746.41 U8.49@607.77,2834.83 ; U8.53@451.28,3107.47 U8.50@919.78,3107.47 ; U8.49@607.77,2912.59 U8.49@685.53,2912.59 ; U8.42@685.53,3105.5 U8.49@685.53,2990.35 ; U8.49@763.27,2990.35 U8.49@685.53,2990.35 ; U8.49@763.28,2912.59 U8.49@685.53,2912.59 U8.49@763.28,2990.34 ; U8.51@919.78,2717.71 901.23,2736.25 897.51,2736.25 891.07,2742.69 891.07,2746.41 802.66,2834.83 U8.49@763.28,2834.83 ; U8.49@607.77,2834.83 U8.49@685.53,2834.83 U8.49@763.28,2834.83 ; U8.49@607.77,2834.83 U8.49@685.53,2912.59 ; U8.49@685.53,2912.59 U8.49@763.28,2834.83 ; U8.49@685.53,2912.59 607.77,2990.34 U8.49@685.53,2990.35
$1N108: C30.1 R8.2 U8.8 | length 199
  Top Layer w10: C30.1@330,2784.02 R8.2@330,2856.8 337.2,2849.6 U8.8@453.25,2849.6
$1N111: SW2.2 U8.12 | length 427
  Top Layer w10: SW2.2@105,2675.44 481.5,2675.44 496.55,2690.48 U8.12@496.55,2719.68
$1N122: C7.2 U5.48 | length 117.4
  Top Layer w10: U5.48@1455.52,1791.8 1533.78,1713.54 C7.2@1533.78,1706.82
$1N124: C8.2 U5.73 | length 93.2
  Top Layer w10: U5.73@1177.13,2212.16 1180.07,2212.16 C8.2@1243.87,2275.96
$1N127: C9.2 C10.1 L2.2 U5.20 U5.21 | length 282.6
  Top Layer w10: L2.2@886.86,1515.9 C9.2@936.36,1466.41 ; C10.1@954.04,1385.09 954.04,1448.73 C9.2@936.36,1466.41 ; U5.20@993.4,1555.17 U5.21@1007.32,1541.25 936.36,1470.3 C9.2@936.36,1466.41
$1N144: R7.1 U5.94 | length 98
  Top Layer w10: R7.1@743.39,2058.81 812.45,1989.75 U5.94@812.45,1989.45
$1N145: C16.2 SW1.1 U5.14 | length 1379
  Top Layer w10: C16.2@837.37,1565.4 909.89,1637.92 U5.14@909.89,1638.69 925.63,1654.43 925.63,1658.22 970.61,1703.21 v1(970.61,1712.86)
  Top Layer w15.75: v1(1690.63,1298.43) 1708.7,1280.35 SW1.1@1949.96,1280.35
  Bottom Layer w10: v1(970.61,1712.86) 983.05,1712.86 1081.34,1614.57 1081.34,1584.06 1366.97,1298.43 v1(1690.63,1298.43)
$1N166: C33.2 U5.13 X1.3 | length 314.7
  Top Layer w10: C33.2@639.38,1512.28 692.97,1565.87 X1.3@708.39,1565.87 763.39,1565.87 817.2,1619.69 863.04,1619.69 U5.13@895.96,1652.61
$1N167: C34.1 U5.12 X1.1 | length 282.1
  Top Layer w10: C34.1@649.98,1720.88 675.88,1720.88 X1.1@722.31,1674.45 728.79,1680.93 774.04,1680.93 815.2,1639.76 855.29,1639.76 U5.12@882.05,1666.52
$1N241: Q1.1 R10.2 | length 113.2
  Top Layer w10: R10.2@425.55,1238.07 427.8,1238.07 455.79,1210.08 455.79,1174.9 Q1.1@430.22,1149.33
$1N244: BUZZER1.2 D4.1 Q1.3 | length 272.6
  Top Layer w10: BUZZER1.2@523.91,950.8 523.91,1002.74 Q1.3@465.09,1061.56 523.96,1120.43 D4.1@523.96,1174.68
$1N260: C32.2 L1.2 U2.3 | length 264.1
  Top Layer w10: C32.2@264.27,370.86 290.3,396.89 361.42,396.89 U2.3@388.02,370.29 ; U2.3@388.02,346.81 U2.3@388.02,370.29 ; L1.2@392.78,463.38 388.02,458.62 U2.3@388.02,370.29
$1N262: C32.1 U2.5 | length 124.8
  Top Layer w10: C32.1@264.27,315.74 298.13,315.74 U2.5@362.42,251.45
$1N265: R1.1 R2.1 U2.8 | length 371.6
  Top Layer w10: R2.1@550.62,244.29 446.36,244.29 U2.8@439.2,251.45 551.4,363.65 R1.1@551.4,462.23
+5V: D3.5 U4.2 USB1.A4B9 USB1.B4A9 | length 1400.9
  Top Layer w10: U4.2@1641.1,930.98 1754.88,930.98 v1(1793.03,969.13) ; v1(1712.72,1641.77) 1737.5,1616.99 D3.5@1761.33,1616.99 ; v1(1855.28,1386.77) 1883.39,1414.88 1883.39,1491.44 1903.76,1511.81 1922.25,1511.81 USB1.A4B9@1930.95,1520.52 1939.65,1529.22 1958.14,1529.22 1964.57,1535.65 1964.57,1694.36 1958.14,1700.8 1939.65,1700.8 USB1.B4A9@1930.95,1709.5
  Bottom Layer w10: v1(1712.72,1641.77) 1712.72,1618.13 1717.67,1613.18 1717.67,1594.13 1712.72,1589.18 1712.72,1529.33 v1(1855.28,1386.77) 1855.28,1051.7 cw(c1815.91,1051.7) 1843.74,1023.86 1793.03,973.15 v1(1793.03,969.13)
ADC1_INP11: CN3.2 U5.16 | length 885.8
  Top Layer w10: CN3.2@200.79,1255.86 v1(269.06,1255.86) ; v1(887.48,1557.44) 887.48,1560.6 U5.16@937.73,1610.85
  Inner2 w10: v1(269.06,1255.86) 501.57,1255.86 803.15,1557.44 v1(887.48,1557.44)
ADC1_INP15: CN3.1 U5.25 | length 1082.2
  Top Layer w10: CN3.1@200.79,1295.23 v1(265.04,1295.23) ; v1(1032.05,1453.03) 1032.05,1454.63 U5.25@1063,1485.58
  Inner2 w10: v1(265.04,1295.23) 508.81,1295.23 813.19,1599.61 917.6,1599.61 987.87,1529.33 987.87,1497.2 v1(1032.05,1453.03)
B+: C1.1 C2.2 C3.2 CN1.1 U2.2 U2.6 | length 677.4
  Top Layer w10: U2.2@413.61,346.81 413.61,314.55 388.02,288.96 U2.6@388.02,251.45 388.02,228.14 C3.2@431.48,184.68 C3.2@443.76,172.4
  Top Layer w78.74: 387.52,108.38 C2.2@443.76,108.38 ; C2.2@417.98,122.77 C3.2@417.98,179.02 ; 1514.84,529.41 C1.1@1571.08,529.41 ; 1527.12,561.48 C1.1@1583.36,561.48
  Top Layer w100: 714.8,145.91 902.36,145.91 CN1.1@942.52,186.07
BARO_CS: U5.2 U7.2 | length 855.9
  Top Layer w10: U5.2@742.85,1805.73 783.7,1846.57 v1(789.09,1846.57) ; v1(1311.14,1404.84) 1346.71,1369.27 U7.2@1346.71,1340.33
  Bottom Layer w10: v1(789.09,1846.57) 869.41,1846.57 1099.41,1616.57 1113.85,1616.57 1127.32,1603.11 1127.32,1588.66 v1(1311.14,1404.84)
buzzer: R10.1 U5.5
BUZZER:  | length 749.1
  Top Layer w10: 383.6,1280.01 556.18,1452.59 556.18,1667.67 644.74,1756.22 686.69,1756.22 712.8,1730.12 750.94,1730.12 784.7,1763.87
CC1: R5.2 USB1.A5 | length 116.7
  Top Layer w10: R5.2@1851.23,1496.99 1851.23,1511.51 1905.53,1565.8 USB1.A5@1930.95,1565.8
CC2: R4.2 USB1.B5 | length 97.7
  Top Layer w10: R4.2@1861.23,1731.99 1861.23,1718.14 1895.46,1683.91 USB1.B5@1930.95,1683.91
D+: D3.1 USB1.A6 USB1.B6 | length 391
  Top Layer w10: USB1.A6@1930.95,1605.17 1928.15,1602.37 1888.74,1602.37 1865.96,1579.59 D3.1@1851.81,1579.59 1809.03,1579.59 1793.42,1595.2 1793.42,1668.26 1811.1,1685.94 1867.37,1685.94 1883.9,1669.41 1883.9,1667.19 1903.76,1647.33 1928.16,1647.33 USB1.B6@1930.95,1644.54
D-: D3.3 USB1.A7 USB1.B7 | length 322.4
  Top Layer w10: v1(1827.17,1551.42) 1871.32,1551.42 1902.6,1582.69 1928.16,1582.69 USB1.B7@1930.95,1585.48 ; v1(1851.26,1649.8) 1851.26,1653.83 D3.3@1851.81,1654.39 1865.96,1654.39 1892.69,1627.65 1928.15,1627.65 USB1.A7@1930.95,1624.85
  Bottom Layer w10: v1(1827.17,1551.42) 1851.26,1575.51 v1(1851.26,1649.8)
ESC1: H6.1 U5.34 | length 1544.3
  Top Layer w10: H6.1@64.25,2393.78 165.71,2292.32 v1(399.57,2292.32) ; v1(1200.71,1651.81) 1205.77,1651.81 U5.34@1260.65,1596.93
  Bottom Layer w10: v1(399.57,2292.32) 590.7,2292.32 705.67,2177.36 705.67,2163.22 1200.71,1668.18 v1(1200.71,1651.81)
ESC2: H7.1 U5.35 | length 1642.9
  Top Layer w10: H7.1@62.44,2507.02 121.77,2447.69 121.77,2376.18 175.51,2322.44 v1(397.56,2322.44) ; v1(1224.8,1675.91) 1253.5,1647.21 1253.5,1631.14 1273.8,1610.85 U5.35@1274.56,1610.85
  Bottom Layer w10: v1(397.56,2322.44) 404.68,2315.31 599.45,2315.31 719.69,2195.08 719.69,2181.02 v1(1224.8,1675.91)
ESP_RX: U5.68 U8.30 | length 986.5
  Top Layer w10: U8.30@917.81,2912.59 963.94,2912.59 v1(1022.01,2854.53) ; U5.68@1246.73,2142.57 1250.69,2142.57 1271.75,2163.63 1278.83,2163.63 v1(1303.11,2187.91)
  Bottom Layer w10: v1(1022.01,2854.53) 1285.04,2591.5 1285.04,2205.98 v1(1303.11,2187.91)
ESP_TX: U5.69 U8.31 | length 1032.9
  Top Layer w10: U8.31@917.81,2944.09 918.98,2942.91 v1(991.14,2942.91) ; U5.69@1232.81,2156.49 1314.3,2237.98 v1(1315.03,2237.98)
  Bottom Layer w10: v1(991.14,2942.91) 1315.03,2619.03 1315.03,2276.52 1310.24,2271.73 1310.24,2252.68 1315.03,2247.89 v1(1315.03,2237.98)